# Altium PCB IDC_AIO_ELOAD.PcbDoc
Units mm, origin at the board's own origin, x right, y up, seen from the top; angles counter-clockwise.
Board outline 64 x 88 mm, 2 copper layers (Top Layer, Bottom Layer); 23 components, 104 nets, 290 pads, 198 vias.
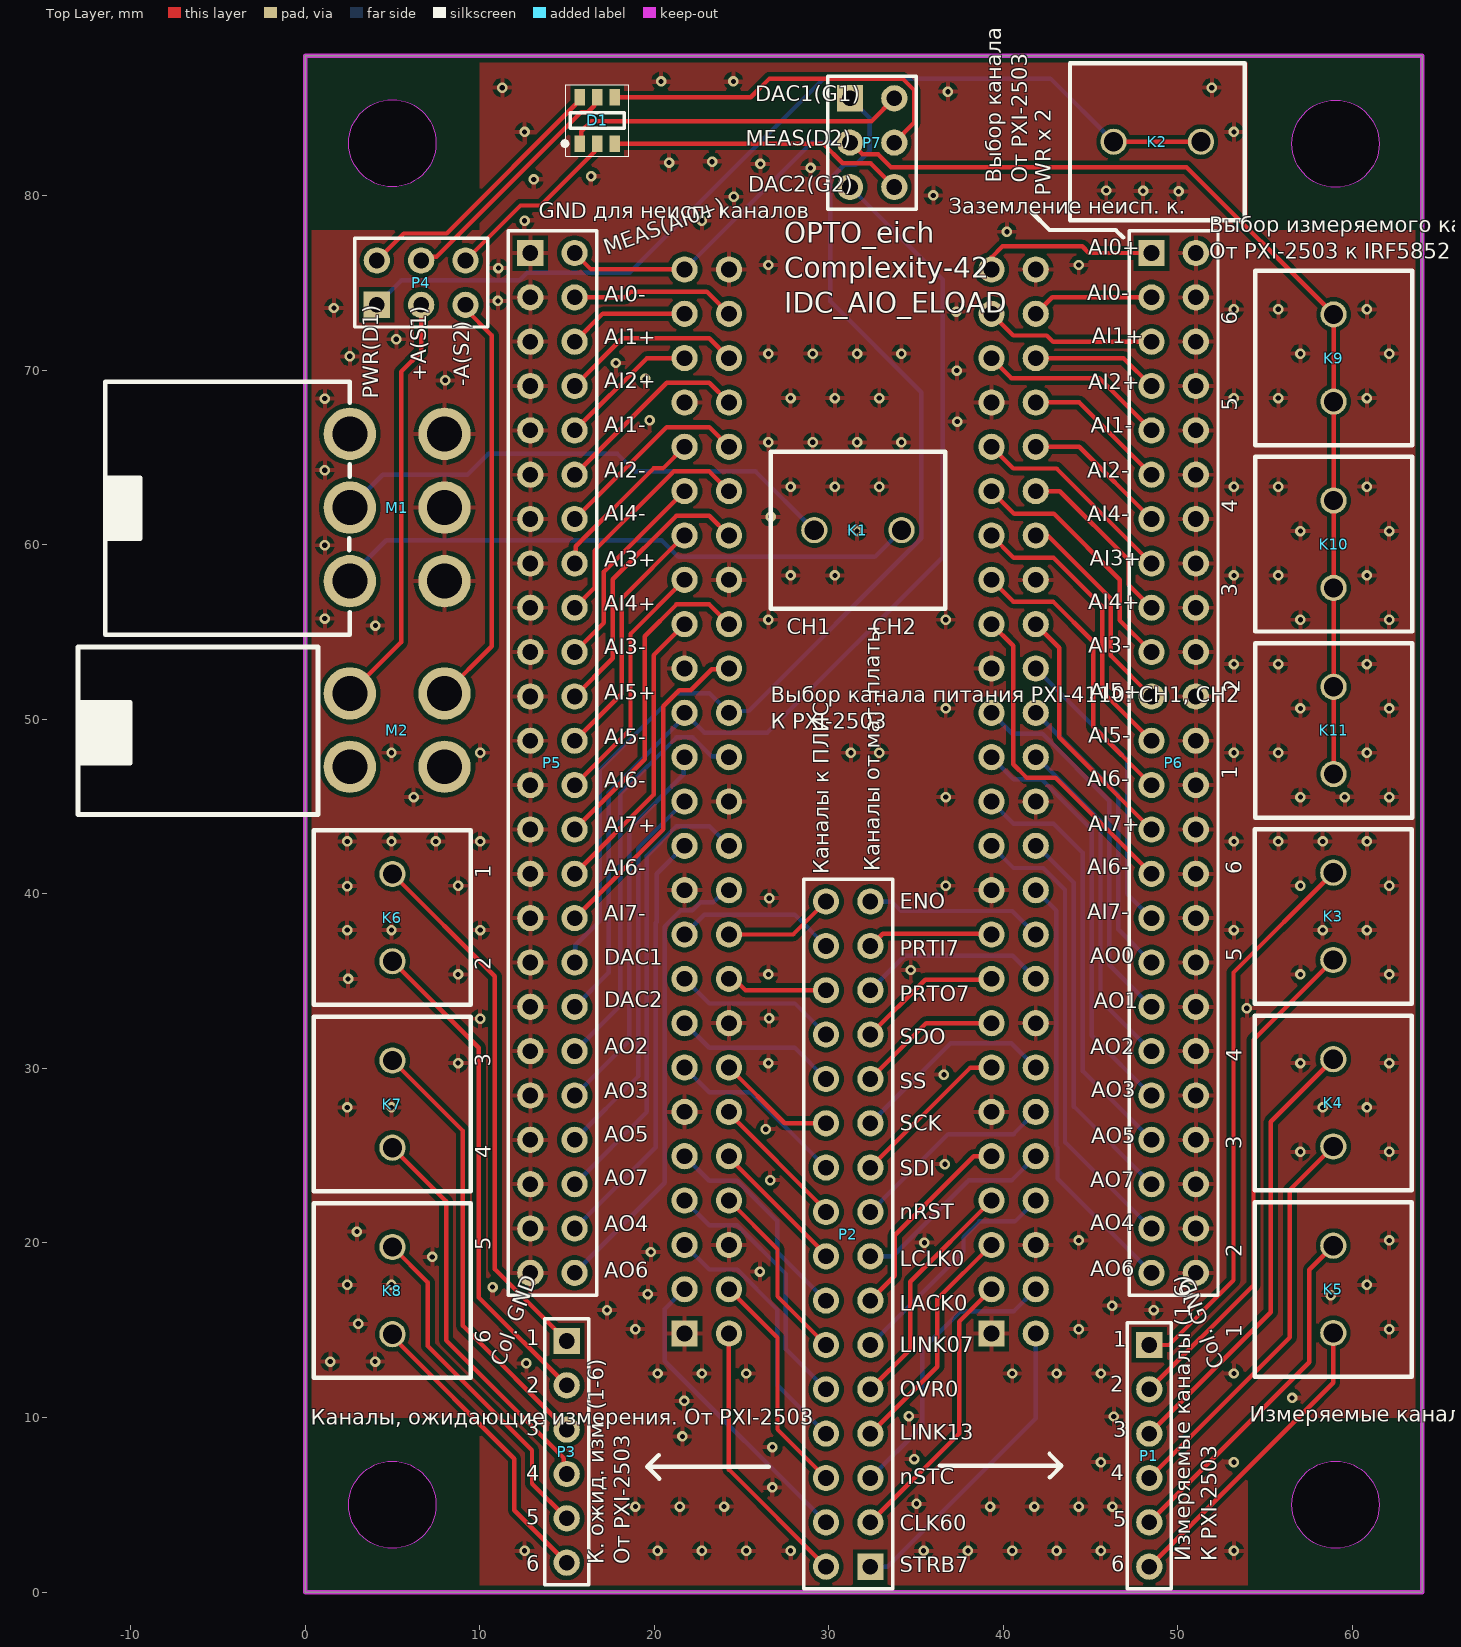
[diagram p0: Top Layer view]
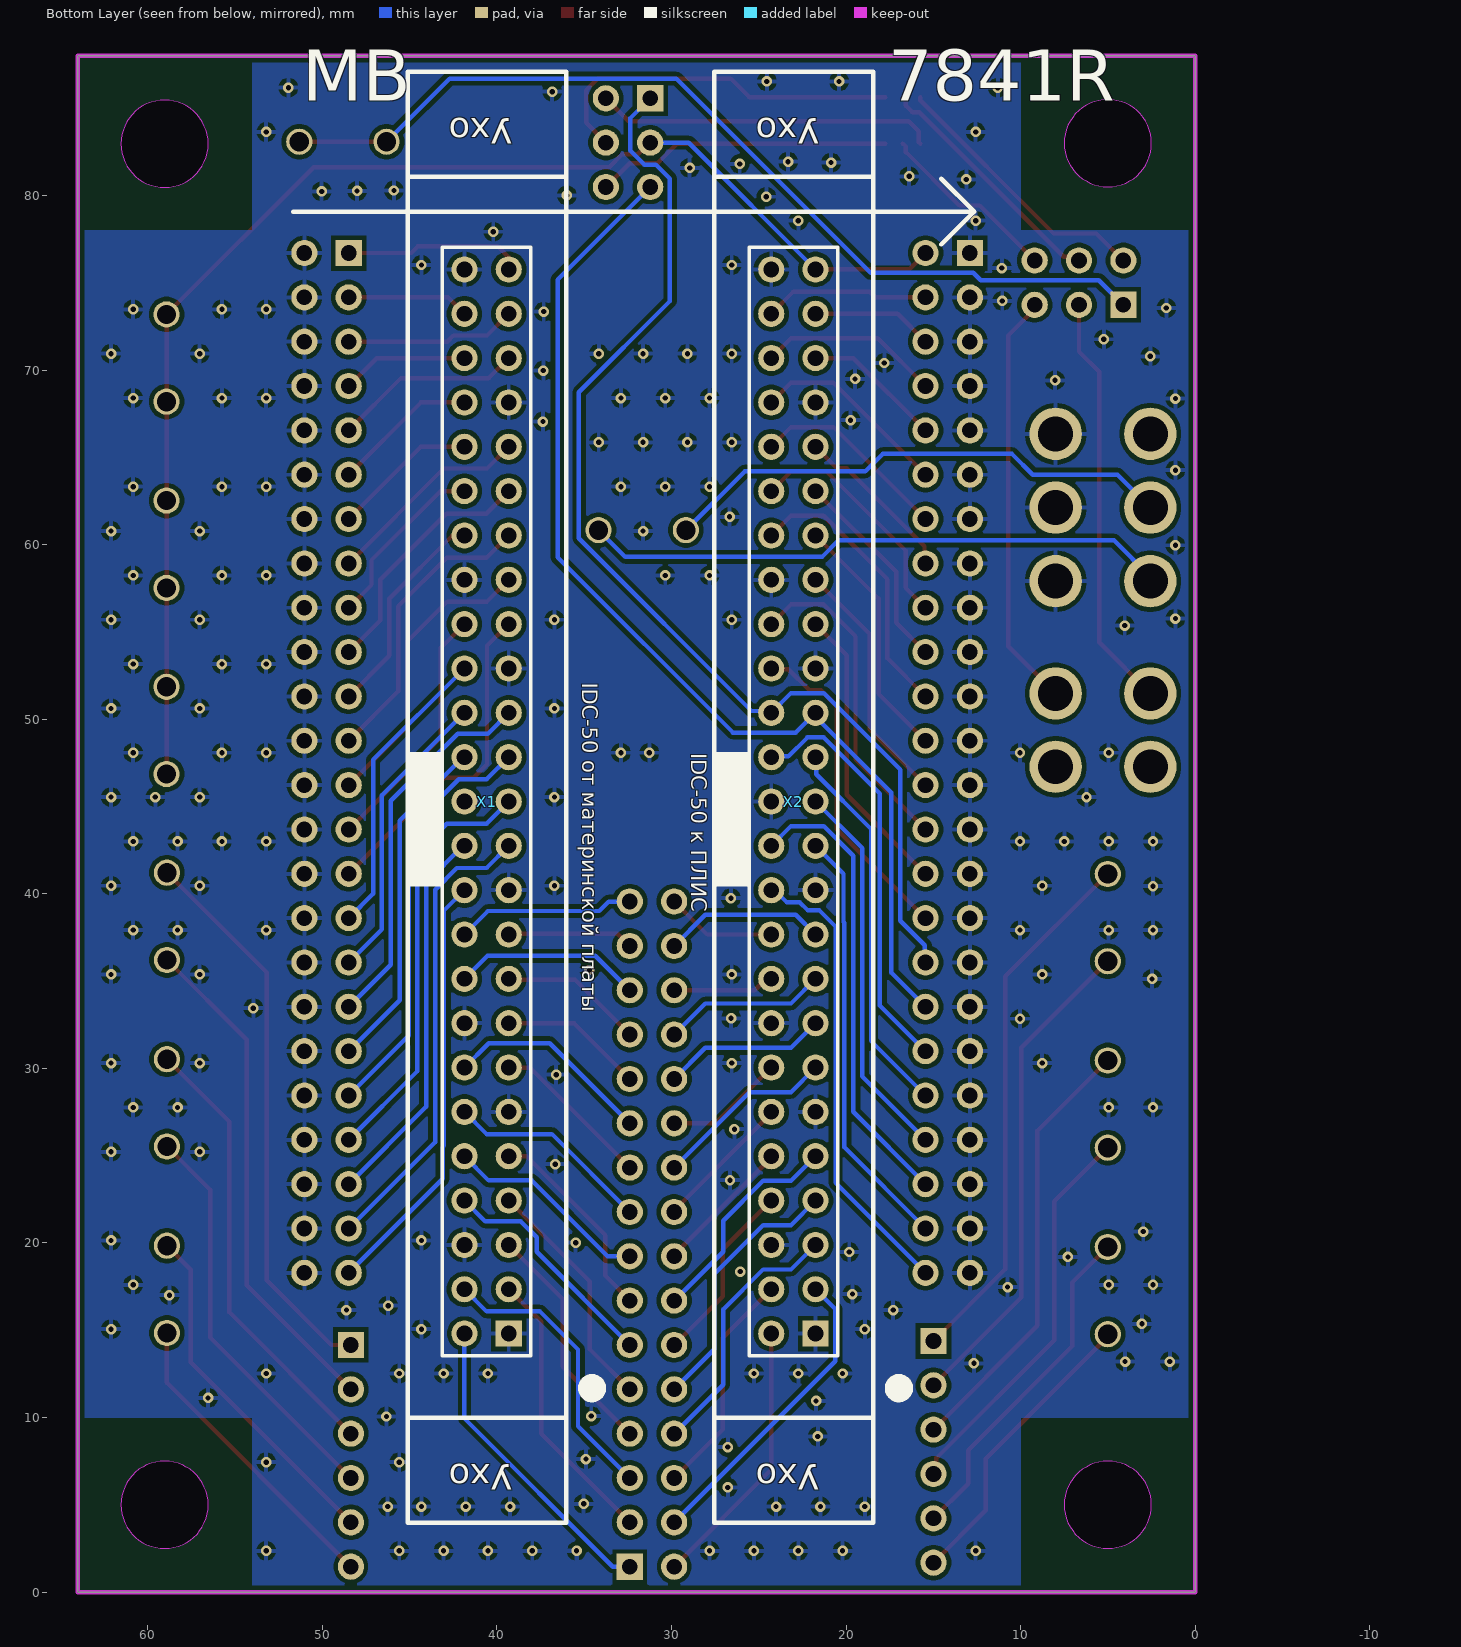
[diagram p1: Bottom Layer view, seen from below]

## Layer stack, top to bottom
Top Solder: solder mask 0.0102, Solder Resist, Dk 3.5
Top Layer: signal copper 0.0356
Dielectric 1: dielectric 0.32, FR-4, Dk 4.8
Bottom Layer: signal copper 0.0356
Bottom Solder: solder mask 0.0102, Solder Resist, Dk 3.5

## Board outline
0,0 0,88 64,88 64,0
cut-out: 59.032,2.5 cw(c59.032,5) 56.532,5 cw(c59.032,5) 59.032,7.5 cw(c59.032,5) 61.532,5 cw(c59.032,5)
cut-out: 59.032,80.468 cw(c59.032,82.968) 56.532,82.968 cw(c59.032,82.968) 59.032,85.468 cw(c59.032,82.968) 61.532,82.968 cw(c59.032,82.968)
cut-out: 5,2.5 cw(c5,5) 2.5,5 cw(c5,5) 5,7.5 cw(c5,5) 7.5,5 cw(c5,5)
cut-out: 5,80.5 cw(c5,83) 2.5,83 cw(c5,83) 5,85.5 cw(c5,83) 7.5,83 cw(c5,83)

## Design rules (kind name [scope] priority, off if disabled: settings)
Clearance [All] p1: gap=0.254 ignorepadtopadclearanceinfootprint=FALSE except(0: Arc-Hole Track-Hole SMDPad-Hole THPad-Hole Via-Hole Fill-Hole Poly-Hole Region-Hole Text-Hole)
MinimumSolderMaskSliver [All] p1: minsoldermaskwidth=0.1
PolygonConnect [All] p1: connectstyle=Relief reliefconductorwidth=0.254 reliefentries=4 polygonreliefangle="90 Angle" airgapwidth=0.254
RoutingVias [All] p1: holewidth=0.711 width=1.27 viastyle="Through Hole" minholewidth=0.711 minwidth=1.27 maxholewidth=0.711 maxwidth=1.27
SilkToSolderMaskClearance [IsPad] p1: minsilkscreentomaskgap=0.1 clearancetoexposedcopper=TRUE
SolderMaskExpansion [All] p1: expansion=0.102 istentingtop=FALSE
UnRoutedNet [All] p1: checkbadconnections=TRUE
Width [All] p1: maxlimit=0.254 minlimit=0.254 preferedwidth=0.254
27 further rules are at their usual default settings.

## Components (designator, comment, footprint, x,y, rotation, side; value= is the part's Value field where it differs from the comment)
D1 "IRF5852PbF" IRF5852PbF 16.739,84.303 r90 top
K1 "KLEMMNIK-2" KLEMMNIK-2 31.674,60.833 r180 top locked
K2 "KLEMMNIK-2" KLEMMNIK-2 48.819,83.083 r0 top locked
K3 "KLEMMNIK-2" KLEMMNIK-2 58.903,38.71 r270 top locked
K4 "KLEMMNIK-2" KLEMMNIK-2 58.903,28.026 r270 top locked
K5 "KLEMMNIK-2" KLEMMNIK-2 58.903,17.343 r270 top locked
K6 "KLEMMNIK-2" KLEMMNIK-2 5.004,38.638 r270 top locked
K7 "KLEMMNIK-2" KLEMMNIK-2 5.004,27.955 r270 top locked
K8 "KLEMMNIK-2" KLEMMNIK-2 5.004,17.272 r270 top locked
K9 "KLEMMNIK-2" KLEMMNIK-2 58.922,70.694 r270 top locked
K10 "KLEMMNIK-2" KLEMMNIK-2 58.922,60.026 r270 top locked
K11 "KLEMMNIK-2" KLEMMNIK-2 58.922,49.358 r270 top locked
M1 "POWER-4110" POWER-4110 -8.359,63.221 r90 top locked
M2 "VOLTMETER-4070" VOLTMETER-4070 -5.387,48.878 r270 top locked
P1 "Header 6" HDR1X6 48.363,14.156 r270 top locked
P2 "Header 16X2A" HDR2X16_CEN 32.385,1.456 r90 top locked
P3 "Header 6" HDR1X6 14.988,14.385 r270 top locked
P4 "Header 3X2A" HDR2X3_CEN 4.112,73.741 r0 top locked
P5 "Header 24X2" HDR2X24 12.903,76.708 r270 top locked
P6 "Header 24X2" HDR2X24 48.489,76.708 r270 top locked
P7 "Header 3X2A" HDR2X3_CEN 31.217,85.573 r270 top locked
X1 "IDC_AIO" IDC_AIO 39.319,14.808 r90 bottom locked
X2 "IDC_AIO" IDC_AIO 21.742,14.808 r90 bottom locked

## Footprints (in the part's own frame and the unit in brackets; to place one, negate y for a bottom-side part, rotate by r counter-clockwise, add the part's x,y. Pads: shape width x height; smd on the part's side, far side on the other; paste and mask are expansions set on the pad)
HDR1X6 [mm] "Connector; Header; 6 Position"
  rect 1.5x1.5 hole 0.9: 1(0,0)
  round 1.5 hole 0.9: 2(2.54,0) 3(5.08,0) 4(7.62,0) 5(10.16,0) 6(12.7,0)
  silkscreen extent -1.27,-1.27 13.97,1.27
HDR2X3_CEN [mm] "Connector; Header; 3x2 Position"
  rect 1.5x1.5 hole 0.9: 1(0,0)
  round 1.5 hole 0.9: 2(2.54,0) 3(5.08,0) 4(0,2.54) 5(2.54,2.54) 6(5.08,2.54)
  silkscreen extent -1.27,-1.27 6.35,3.81
HDR2X16_CEN [mm] "Connector; Header; 16x2 Position"
  rect 1.5x1.5 hole 0.9: 1(0,0)
  round 1.5 hole 0.9: 2(2.54,0) 3(5.08,0) 4(7.62,0) 5(10.16,0) 6(12.7,0) 7(15.24,0) 8(17.78,0) 9(20.32,0) 10(22.86,0) 11(25.4,0) 12(27.94,0) 13(30.48,0) 14(33.02,0) 15(35.56,0) 16(38.1,0) 17(0,2.54) 18(2.54,2.54) 19(5.08,2.54) 20(7.62,2.54) 21(10.16,2.54) 22(12.7,2.54) 23(15.24,2.54) 24(17.78,2.54) 25(20.32,2.54) 26(22.86,2.54) 27(25.4,2.54) 28(27.94,2.54) 29(30.48,2.54) 30(33.02,2.54) 31(35.56,2.54) 32(38.1,2.54)
  silkscreen extent -1.27,-1.27 39.37,3.81
HDR2X24 [mm] "Connector; Header; 24x2 Position"
  rect 1.5x1.5 hole 0.9: 1(0,0)
  round 1.5 hole 0.9: 2(0,2.54) 3(2.54,0) 4(2.54,2.54) 5(5.08,0) 6(5.08,2.54) 7(7.62,0) 8(7.62,2.54) 9(10.16,0) 10(10.16,2.54) 11(12.7,0) 12(12.7,2.54) 13(15.24,0) 14(15.24,2.54) 15(17.78,0) 16(17.78,2.54) 17(20.32,0) 18(20.32,2.54) 19(22.86,0) 20(22.86,2.54) 21(25.4,0) 22(25.4,2.54) 23(27.94,0) 24(27.94,2.54) 25(30.48,0) 26(30.48,2.54) 27(33.02,0) 28(33.02,2.54) 29(35.56,0) 30(35.56,2.54) 31(38.1,0) 32(38.1,2.54) 33(40.64,0) 34(40.64,2.54) 35(43.18,0) 36(43.18,2.54) 37(45.72,0) 38(45.72,2.54) 39(48.26,0) 40(48.26,2.54) 41(50.8,0) 42(50.8,2.54) 43(53.34,0) 44(53.34,2.54) 45(55.88,0) 46(55.88,2.54) 47(58.42,0) 48(58.42,2.54)
  silkscreen extent -1.27,-1.27 59.69,3.81
IDC_AIO [mm]
  rect 1.5x1.5 hole 0.9: 1(0,0)
  round 1.5 hole 0.9: 2(0,2.54) 3(2.54,0) 4(2.54,2.54) 5(5.08,0) 6(5.08,2.54) 7(7.62,0) 8(7.62,2.54) 9(10.16,0) 10(10.16,2.54) 11(12.7,0) 12(12.7,2.54) 13(15.24,0) 14(15.24,2.54) 15(17.78,0) 16(17.78,2.54) 17(20.32,0) 18(20.32,2.54) 19(22.86,0) 20(22.86,2.54) 21(25.4,0) 22(25.4,2.54) 23(27.94,0) 24(27.94,2.54) 25(30.48,0) 26(30.48,2.54) 27(33.02,0) 28(33.02,2.54) 29(35.56,0) 30(35.56,2.54) 31(38.1,0) 32(38.1,2.54) 33(40.64,0) 34(40.64,2.54) 35(43.18,0) 36(43.18,2.54) 37(45.72,0) 38(45.72,2.54) 39(48.26,0) 40(48.26,2.54) 41(50.8,0) 42(50.8,2.54) 43(53.34,0) 44(53.34,2.54) 45(55.88,0) 46(55.88,2.54) 47(58.42,0) 48(58.42,2.54) 49(60.96,0) 50(60.96,2.54)
  silkscreen extent -10.83,-5.16 72.27,5.85
IRF5852PbF [mm] "TSOP, 6-Leads, Body 3,00x1,50mm, Pitch 1,00mm, IPC Medium Density"
  rect 0.95x0.6 smd: 1(-1.325,1) 2(-1.325,0) 3(-1.325,-1) 4(1.325,-1) 5(1.325,0) 6(1.325,1)
  silkscreen extent -2.05,-1.8 2.05,1.97, body extent -0.85,-1.55 0.85,1.55, height 1.1
KLEMMNIK-2 [mm]
  round 1.5 hole 1.1: 1(-2.5,0) 2(2.5,0)
  silkscreen extent -5,-4.5 5,4.5
POWER-4110 [mm]
  round 3 hole 2: 1(3.125,-10.925) 2(-1.092,-10.925) 3(-5.31,-10.925) 4(-5.31,-16.347) 5(-1.092,-16.347) 6(3.125,-16.347)
  silkscreen extent -8.37,-10.92 6.12,3.08
VOLTMETER-4070 [mm]
  round 3 hole 2: 1(-2.6,13.375) 2(-2.6,7.952) 3(1.6,7.952) 4(1.6,13.375)
  silkscreen extent -5.26,-7.62 4.34,6.13

## Part data
P1 P3: "Header, 6-Pin", LatestRevisionDate=17-Jul-2002, LatestRevisionNote="Re-released for DXP Platform.", Publisher="Altium Limited"
P2: "Header, 16-Pin, Dual row", LatestRevisionDate=17-Jul-2002, LatestRevisionNote="Re-released for DXP Platform.", Publisher="Altium Limited"
P4 P7: "Header, 3-Pin, Dual row", LatestRevisionDate=17-Jul-2002, LatestRevisionNote="Re-released for DXP Platform.", Publisher="Altium Limited"
P5 P6: "Header, 24-Pin, Dual row", LatestRevisionDate=17-Jul-2002, LatestRevisionNote="Re-released for DXP Platform.", Publisher="Altium Limited"

## Via types
v1: diameter 0.6/0.6 (per signal layer), hole 0.3, Top Layer to Bottom Layer, 198 vias

## Nets (pads, with @x,y where several pads share a name; then routed paths per layer and width w, separated by ;. In a path a pad name is that pad's centre, name@x,y a point inside that pad or via, vN(x,y) a via of type N, cw(c..) or ccw(c..) an arc to the next point about the centre after c; other vN are vias at no path point)
+A: M2.2 P4.2 | length 24
  Top Layer w0.254: M2.2 5.5,54.413 5.5,69.9 6.652,71.052 P4.2
+A_safe: D1.5 P4.5 | length 14.1
  Top Layer w0.254: P4.5 6.864,76.493 7.532,76.493 15.811,84.772 16.196,84.772 16.566,85.141 16.566,85.455 D1.5
-A: M2.1 P4.3 | length 24
  Top Layer w0.254: M2.1 10.7,54.19 10.7,71.988 9.192,73.496 P4.3
-A_safe: D1.2 P4.6 | length 10.5
  Top Layer w0.254: P4.6 12.343,79.432 13.507,79.432 16.566,82.491 16.566,82.805 D1.2
AI0+: P6.1 X1.49 | length 9.6
  Top Layer w0.254: X1.49@39.319,76.454 39.954,77.089 44.521,77.089 44.902,76.708 P6.1
AI0-: P6.3 X1.48 | length 7
  Top Layer w0.254: X1.48 42.799,74.168 P6.3
AI0-_OUT: P5.4 X2.48 | length 9.5
  Top Layer w0.254: P5.4 18.347,74.168 18.677,74.498 23.012,74.498 X2.48
AI1+: P6.5 X1.47 | length 9.8
  Top Layer w0.254: X1.47 40.564,71.984 42.494,71.984 42.85,71.628 P6.5
AI1+_OUT: P5.6 X2.47 | length 7
  Top Layer w0.254: P5.6 17.043,73.228 X2.47
AI1-: P6.9 X1.45 | length 10.9
  Top Layer w0.254: X1.45 40.462,69.545 45.491,69.545 P6.9
AI1-_OUT: P5.10 X2.45 | length 8
  Top Layer w0.254: P5.10 19.583,70.688 X2.45
AI2+: P6.7 X1.46 | length 7.3
  Top Layer w0.254: X1.46 46.888,70.688 P6.7
AI2+_OUT: P5.8 X2.46 | length 10.4
  Top Layer w0.254: P5.8 18.174,71.819 23.151,71.819 X2.46
AI2-: P6.11 X1.44 | length 8.3
  Top Layer w0.254: X1.44 44.348,68.148 P6.11
AI2-_OUT: P5.12 X2.44 | length 11.5
  Top Layer w0.254: P5.12 20.714,69.279 23.151,69.279 X2.44
AI3+: P6.15 X1.41 | length 11.9
  Top Layer w0.254: X1.41 40.564,64.364 43.053,64.364 P6.15
AI3+_OUT: P5.16 X2.41 | length 9.5
  Top Layer w0.254: P5.16@15.502,58.987 15.502,59.91 19.959,64.367 20.501,64.367 X2.41
AI3-: P6.19 X1.39 | length 14.4
  Top Layer w0.254: X1.39 40.615,61.773 42.9,61.773 46.674,57.999 46.674,55.663 P6.19
AI3-_OUT: P5.20 X2.39 | length 11.8
  Top Layer w0.254: P5.20 17.12,55.524 17.12,58.445 X2.39
AI4+: P6.17 X1.40 | length 10.2
  Top Layer w0.254: X1.40 43.231,63.068 47.182,59.117 47.182,57.695 P6.17
AI4+_OUT: P5.18 X2.40 | length 13.8
  Top Layer w0.254: P5.18 16.586,57.531 16.586,59.665 21.121,64.199 23.151,64.199 X2.40
AI4-: P6.13 X1.42 | length 8.3
  Top Layer w0.254: X1.42 44.348,65.608 P6.13
AI4-_OUT: P5.14 X2.42 | length 11.5
  Top Layer w0.254: P5.14 20.714,66.739 23.151,66.739 X2.42
AI5+: P6.21 X1.38 | length 12.4
  Top Layer w0.254: X1.38 42.545,60.528 46.166,56.907 46.166,53.631 P6.21
AI5+_OUT: P5.22 X2.38 | length 16.2
  Top Layer w0.254: P5.22 17.628,53.492 17.628,58.013 21.274,61.659 23.151,61.659 X2.38
AI5-: P6.23 X1.37 | length 16.9
  Top Layer w0.254: X1.37 40.589,59.258 42.874,59.258 45.658,56.475 45.658,51.599 P6.23
AI5-_OUT: P5.24 X2.37 | length 14.4
  Top Layer w0.254: P5.24 18.136,51.46 18.136,56.921 X2.37
AI6+: P6.25 X1.35 | length 16.9
  Top Layer w0.254: X1.35 40.564,56.744 42.849,56.744 45.15,54.443 45.15,49.567 P6.25
AI6+_OUT: P5.26 X2.35 | length 14.4
  Top Layer w0.254: P5.26 18.644,49.428 18.644,54.889 X2.35
AI6-: P6.29 X1.33 | length 19.1
  Top Layer w0.254: X1.33 40.564,54.204 40.564,47.422 41.326,46.66 42.977,46.66 P6.29
AI6-_OUT: P5.30 X2.33 | length 16.9
  Top Layer w0.254: P5.30 19.964,45.669 19.964,53.67 X2.33
AI7+: P6.27 X1.34 | length 14.5
  Top Layer w0.254: X1.34 43.205,54.102 43.205,48.971 P6.27
AI7+_OUT: P5.28 X2.34 | length 18.7
  Top Layer w0.254: P5.28@15.509,43.754 19.456,47.701 19.456,54.762 21.274,56.579 23.151,56.579 X2.34
AI7-: P6.31 X1.32 | length 17
  Bottom Layer w0.254: X1.32 47.092,47.676 47.092,40.005 P6.31
AI7-_OUT: P5.32 X2.32 | length 18.9
  Top Layer w0.254: P5.32 20.523,43.688 20.523,50.748 21.433,51.658 22.092,51.658 23.3,52.867 24.241,52.867 X2.32
AO0: P6.33 X1.30 | length 17
  Bottom Layer w0.254: X1.30 46.584,45.644 46.584,37.973 P6.33
AO1: P6.35 X1.29 | length 21.7
  Bottom Layer w0.254: X1.29 40.513,49.174 42.24,49.174 46.076,45.339 46.076,35.941 P6.35
AO2: P6.37 X1.28 | length 19.6
  Bottom Layer w0.254: X1.28 41.935,47.828 45.568,44.195 45.568,33.909 P6.37
AO2_OUT: P5.38 X2.28 | length 23.8
  Bottom Layer w0.254: P5.38 18.059,33.604 18.059,45.745 21.274,48.959 22.211,48.959 23.3,47.87 X2.28@24.282,47.87
AO3: P6.39 X1.27 | length 24.1
  Bottom Layer w0.254: X1.27 40.589,46.558 42.189,46.558 45.06,43.688 45.06,31.877 P6.39
AO3_OUT: P5.40 X2.27 | length 22
  Bottom Layer w0.254: P5.40 18.567,31.572 18.567,43.713 21.701,46.846 21.701,47.787 X2.27
AO4: P6.45 X1.23 | length 26.7
  Bottom Layer w0.254: X1.23 40.589,41.478 42.291,41.478 43.536,40.234 43.536,25.781 P6.45
AO4_OUT: P5.46 X2.23 | length 24.5
  Bottom Layer w0.254: P5.46 20.091,25.476 20.091,38.335 20.142,38.386 20.142,41.148 X2.23
AO5: P6.41 X1.25 | length 24.5
  Bottom Layer w0.254: X1.25 40.589,44.018 42.874,44.018 44.552,42.341 44.552,29.845 P6.41
AO5_OUT: P5.42 X2.25 | length 22
  Bottom Layer w0.254: P5.42 19.075,29.54 19.075,42.621 X2.25
AO6: P6.47 X1.22 | length 24.7
  Bottom Layer w0.254: X1.22 43.028,39.04 43.028,25.571 43.104,25.494 43.104,23.673 P6.47
AO6_OUT: P5.48 X2.22 | length 26.8
  Bottom Layer w0.254: P5.48 20.599,23.444 20.599,38.125 21.522,39.047 22.181,39.047 22.642,39.509 23.383,39.509 24.082,40.208 X2.22 X2.22@24.092,40.018
AO7: P6.43 X1.24 | length 22.2
  Bottom Layer w0.254: X1.24 41.935,42.748 44.044,40.639 44.044,27.813 P6.43
AO7_OUT: P5.44 X2.24 | length 26.4
  Bottom Layer w0.254: P5.44 19.583,27.508 19.583,42.189 21.274,43.879 23.151,43.879 X2.24
CH1: K1.2 M1.2 | length 29.7
  Bottom Layer w0.254: M1.2 4.447,64.009 9.3,64.009 10.491,65.2 17.9,65.2 18.901,64.199 25.808,64.199 K1.2
CH2: K1.1 M1.3 | length 33.8
  Bottom Layer w0.254: M1.3 2.566,58.166 4.647,60.247 20.424,60.247 21.371,59.3 32.641,59.3 K1.1
CLK_60: P2.2 X1.3 | length 16.2
  Top Layer w0.254: P2.2 37.465,9.076 37.465,15.494 X1.3
CLK_60_DIG: P2.18 X2.3 | length 17.6
  Bottom Layer w0.254: X2.3 20.611,16.217 20.611,13.23 P2.18
DAC1: P5.34 P7.1 X2.30 | length 65.6
  Bottom Layer w0.254: P5.34 15.485,36.11 15.485,37.05 16.894,38.46 16.894,47.12 21.274,51.499 23.151,51.499 X2.30 24.387,50.473 25.413,50.473 35.305,60.365 35.305,68.735 30.086,73.954 30.086,80.961 30.887,81.763 31.546,81.763 32.348,82.564 32.348,84.442 P7.1
DAC1_safe: D1.1 P7.4 | length 19.5
  Top Layer w0.254: D1.1 15.827,83.066 15.827,83.685 16.406,84.264 32.448,84.264 P7.4
DAC2: P5.36 P7.3 X2.29 | length 62.3
  Bottom Layer w0.254: P5.36 17.402,35.487 17.402,45.806 21.742,50.146 X2.29 22.873,49.237 26.478,49.237 36.524,59.283 36.524,75.185 P7.3
DAC2_safe: D1.3 P7.6 | length 17
  Top Layer w0.254: D1.3 29.672,82.978 30.795,81.854 32.395,81.854 P7.6
ENO: P2.16 X1.20 | length 10.3
  Bottom Layer w0.254: P2.16 33.598,39.556 34.14,39.014 40.513,39.014 X1.20
ENO_DIG: P2.32 X2.20 | length 6.3
  Top Layer w0.254: X2.20 27.957,37.668 P2.32
GND: M1.4 M1.5 M1.6 P5.1 P5.3 P5.5 P5.7 P5.9 P5.11 P5.13 P5.15 P5.17 P5.19 P5.21 P5.23 P5.25 P5.27 P5.29 P5.31 P5.33 P5.35 P5.37 P5.39 P5.41 P5.43 P5.45 P5.47 P6.2 P6.4 P6.6 P6.8 P6.10 P6.12 P6.14 P6.16 P6.18 P6.20 P6.22 P6.24 P6.26 P6.28 P6.30 P6.32 P6.34 P6.36 P6.38 P6.40 P6.42 P6.44 P6.46 P6.48 X1.1 X1.6 X1.11 X1.16 X1.21 X1.26 X1.31 X1.36 X1.43 X1.50 X2.1 X2.6 X2.11 X2.16 X2.21 X2.26 X2.31 X2.36 X2.43 X2.50
  other v1: 12.573,2.362 20.193,2.362 22.733,2.362 25.273,2.362 27.813,2.362 35.433,2.362 37.973,2.362 40.513,2.362 43.053,2.362 45.593,2.362 53.213,2.362 18.923,4.902 21.463,4.902 24.003,4.902 39.243,4.902 41.783,4.902 44.323,4.902 46.253,4.902 35.027,5.055 26.772,5.994 45.593,7.442 53.213,7.442 34.9,7.62 26.772,8.306 21.615,8.915 46.33,10.058 34.595,10.084 21.717,10.947 56.54,11.125 20.193,12.522 22.733,12.522 25.273,12.522 40.513,12.522 43.053,12.522 45.593,12.522 53.213,12.522 12.675,13.106 1.448,13.208 4.013,13.208 18.923,15.062 44.323,15.062 62.103,15.062 3.048,15.367 17.297,16.154 48.616,16.154 46.228,16.408 58.754,17.011 19.634,17.069 10.744,17.475 2.413,17.602 4.953,17.602 60.833,17.602 26.06,18.364 7.29,19.202 19.812,19.482 35.484,20.015 44.323,20.142 62.103,20.142 2.972,20.65 26.645,23.597 36.652,24.511 57.023,25.222 62.103,25.222 26.391,26.518 2.413,27.762 4.953,27.762 58.293,27.762 60.833,27.762 36.601,29.642 8.763,30.302 26.543,30.302 57.023,30.302 62.103,30.302 10.033,32.842 26.582,32.868 53.95,33.452 2.464,35.128 8.763,35.382 26.543,35.382 57.023,35.382 62.103,35.382 34.696,35.636 2.413,37.922 4.953,37.922 10.033,37.922 53.213,37.922 58.293,37.922 60.833,37.922 26.594,39.751 2.413,40.437 8.763,40.462 36.703,40.462 57.023,40.462 62.103,40.462 2.413,43.002 4.953,43.002 7.493,43.002 10.033,43.002 53.213,43.002 55.753,43.002 58.293,43.002 60.833,43.002 6.223,45.542 36.703,45.542 57.023,45.542 59.563,45.542 62.103,45.542 4.953,48.082 10.033,48.082 31.267,48.082 32.893,48.082 53.213,48.082 55.753,48.082 60.833,48.082 36.703,50.622 57.023,50.622 62.103,50.622 53.213,53.162 55.753,53.162 60.833,53.162 4.031,55.369 26.543,55.702 36.703,55.702 57.023,55.702 62.103,55.702 1.131,55.769 27.813,58.242 30.353,58.242 53.213,58.242 55.753,58.242 60.833,58.242 1.131,59.969 31.623,60.782 57.023,60.782 62.103,60.782 26.67,61.595 27.813,63.322 30.353,63.322 32.893,63.322 53.213,63.322 55.753,63.322 60.833,63.322 1.131,64.269 26.543,65.862 29.083,65.862 31.623,65.862 34.163,65.862 37.363,67.056 19.736,67.132 1.131,68.369 27.813,68.402 30.353,68.402 32.893,68.402 53.213,68.402 55.753,68.402 60.833,68.402 8.026,69.418 19.482,69.494 37.338,69.977 17.805,70.409 2.565,70.79 26.543,70.942 29.083,70.942 31.623,70.942 34.163,70.942 57.023,70.942 62.103,70.942 5.231,71.769 37.313,73.355 53.213,73.482 55.753,73.482 60.833,73.482 1.651,73.558 11.049,73.965 11.074,75.844 26.543,76.022 44.323,76.022 40.208,77.927 12.573,78.562 22.733,78.562 24.562,79.934 35.992,80.01 50.038,80.239 48.006,80.264 45.898,80.289 13.106,80.924 16.383,81.102 28.956,81.585 26.086,81.813 20.853,81.89 23.317,81.94 12.573,83.642 53.213,83.642 36.83,85.954 11.303,86.182 51.943,86.182 20.396,86.538 24.536,86.538
LACK_0: P2.7 X1.9 | length 11.7
  Top Layer w0.254: P2.7 32.385,16.72 33.782,18.117 33.782,20.447 38.303,24.968 X1.9
LACK_0_DIG: P2.23 X2.9 | length 12.6
  Bottom Layer w0.254: X2.9 23.151,23.559 24.751,23.559 27.04,21.27 27.04,19.502 P2.23
LCLK_0: P2.8 X1.10 | length 11.8
  Bottom Layer w0.254: P2.8 33.661,19.236 37.932,23.508 38.007,23.582 40.473,23.582 X1.10
LCLK_0_DIG: P2.24 X2.10 | length 8
  Top Layer w0.254: X2.10 24.282,24.884 29.845,19.321 P2.24
LINK_0_7: P2.6 X1.8 | length 13.4
  Bottom Layer w0.254: P2.6 37.719,19.49 37.719,20.32 38.633,21.234 40.665,21.234 X1.8
LINK_0_7_DIG: P2.22 X2.8 | length 10.6
  Top Layer w0.254: X2.8 27.064,19.647 27.064,16.938 P2.22
LINK_1_3: P2.4 X1.5 | length 13.7
  Top Layer w0.254: P2.4 36.22,12.912 36.22,16.789 X1.5
LINK_1_3_DIG: P2.20 X2.5 | length 15.1
  Bottom Layer w0.254: X2.5 23.151,18.479 24.751,18.479 27.04,16.19 27.04,11.882 P2.20
MEAS_1: K3.1 P1.1 | length 32.1
  Top Layer w0.254: P1.1 49.488,14.156 53.188,17.856 53.188,35.495 K3.1
MEAS_2: K3.2 P1.2 | length 29
  Top Layer w0.254: P1.2 54.331,17.584 54.331,31.638 K3.2
MEAS_3: K4.1 P1.3 | length 25.8
  Top Layer w0.254: P1.3 55.321,16.035 55.321,26.945 K4.1
MEAS_4: K4.2 P1.4 | length 23.4
  Top Layer w0.254: P1.4 56.413,14.587 56.413,23.037 K4.2
MEAS_5: K5.1 P1.5 | length 20.2
  Top Layer w0.254: P1.5 57.531,13.165 57.531,18.472 K5.1
MEAS_6: K5.2 P1.6 | length 17.8
  Top Layer w0.254: P1.6 58.903,11.996 K5.2
MEAS_ADC: K9.1 K9.2 K10.1 K10.2 K11.1 K11.2 P5.2 P7.2 X2.49 | length 77.3
  Top Layer w0.254: P5.2 16.383,75.768 X2.49 ; P7.2 31.265,83.033 31.935,82.362 32.827,82.362 33.566,81.624 50.492,81.624 K9.1 K9.2 K10.1 K10.2 K11.1 K11.2
  Bottom Layer w0.254: X2.49 29.007,83.033 P7.2
MEAS_ADC_safe: D1.4 P7.5 | length 21.3
  Top Layer w0.254: D1.4 25.53,85.628 26.606,86.704 34.225,86.704 34.888,86.041 34.888,84.164 P7.5
MEAS_EXTRA_1: K6.1 P3.1 | length 30.9
  Top Layer w0.254: K6.1 10.871,35.271 10.871,18.502 P3.1
MEAS_EXTRA_2: K6.2 P3.2 | length 28.4
  Top Layer w0.254: K6.2 9.957,31.185 9.957,16.876 P3.2
MEAS_EXTRA_3: K7.1 P3.3 | length 25.3
  Top Layer w0.254: K7.1 9.042,26.417 9.042,15.251 P3.3
MEAS_EXTRA_4: K7.2 P3.4 | length 22.8
  Top Layer w0.254: K7.2 8.077,22.382 8.077,14.427 14.818,7.686 14.818,6.935 P3.4
MEAS_EXTRA_5: K8.1 P3.5 | length 19.7
  Top Layer w0.254: K8.1 7.036,17.74 7.036,14.097 13,8.133 13,6.213 P3.5
MEAS_EXTRA_6: K8.2 P3.6 | length 17.2
  Top Layer w0.254: K8.2 5.004,14.629 11.989,7.644 11.989,4.684 P3.6
nRST: P2.9 X1.12 | length 11.8
  Bottom Layer w0.254: P2.9 36.847,26.238 40.589,26.238 X1.12
nRST_DIG: P2.25 X2.12 | length 8
  Top Layer w0.254: X2.12 24.282,27.424 29.845,21.861 P2.25
nSTC: P2.3 X1.4 | length 16.5
  Bottom Layer w0.254: P2.3 35.352,9.504 35.352,13.896 37.534,16.078 40.589,16.078 X1.4
nSTC_DIG: P2.19 X2.4 | length 13.1
  Top Layer w0.254: X2.4 27.064,14.567 27.064,9.318 P2.19
OVR_0: P2.5 X1.7 | length 13.7
  Top Layer w0.254: P2.5 34.671,13.902 34.671,17.78 X1.7
OVR_0_DIG: P2.21 X2.7 | length 15.1
  Bottom Layer w0.254: X2.7 23.151,21.019 24.751,21.019 27.548,18.222 27.548,13.914 P2.21
PRTI_7: P2.15 X1.19 | length 7.2
  Top Layer w0.254: P2.15 33.088,37.719 39.268,37.719 X1.19
PRTI_7_DIG: P2.31 X2.19 | length 9.3
  Bottom Layer w0.254: X2.19 22.873,38.799 28.062,38.799 P2.31
PRTO_7: P2.14 X1.18 | length 10.8
  Bottom Layer w0.254: P2.14 34.358,36.449 40.538,36.449 X1.18
PRTO_7_DIG: P2.30 X2.18 | length 5.8
  Top Layer w0.254: X2.18 24.578,35.128 25.23,34.476 P2.30
PWR: K2.1 K2.2 P4.1 | length 54.1
  Top Layer w0.254: K2.1 K2.2
  Bottom Layer w0.254: P4.1 5.521,75.15 12.285,75.15 12.713,75.577 18.592,75.577 29.718,86.704 42.699,86.704 K2.1
PWR_safe: D1.6 P4.4 | length 15.6
  Top Layer w0.254: P4.4 5.657,77.826 8.112,77.826 15.739,85.453 D1.6
SCK: P2.11 X1.14 | length 12
  Bottom Layer w0.254: P2.11 36.974,31.445 40.462,31.445 X1.14
SCK_DIG: P2.27 X2.14 | length 6.9
  Top Layer w0.254: X2.14 27.474,26.856 P2.27
SDI: P2.10 X1.13 | length 9.6
  Top Layer w0.254: P2.10 38.117,30.048 X1.13 X1.13@39.099,30.268
SDI_DIG: P2.26 X2.13 | length 10.5
  Bottom Layer w0.254: X2.13 23.151,28.639 25.522,28.639 P2.26
SDO: P2.13 X1.17 | length 8.3
  Top Layer w0.254: P2.13 35.526,35.077 39.268,35.077 X1.17
SDO_DIG: P2.29 X2.17 | length 9.4
  Bottom Layer w0.254: X2.17 23.151,33.719 28.062,33.719 P2.29
SS: P2.12 X1.15 | length 8.3
  Top Layer w0.254: P2.12 35.577,32.588 X1.15
SS_DIG: P2.28 X2.15 | length 9.4
  Bottom Layer w0.254: X2.15 23.151,31.179 28.062,31.179 P2.28
STROB_7: P2.1 X1.2 | length 17.9
  Bottom Layer w0.254: P2.1 33.367,1.456 41.859,9.948 X1.2
STROB_7_DIG: P2.17 X2.2 | length 15.7
  Top Layer w0.254: X2.2 24.282,7.019 P2.17
pads on no net: M1.1 M2.3 M2.4

## Polygon pours and split planes (outlines as drawn)
GND on Top Layer "GND_L01_P000" (solid, remove dead copper, pour order 0): 0,88 64,88 64,0 0,0
GND on Bottom Layer "NONET_L-01_P-001" (solid, remove dead copper, pour order 1): 0,0 0,88 64,88 64,0

## Keep-outs
Keep-Out Layer:
  the board outline again, w0.254

## Other copper
Multi-Layer:
  pour cut-out: 54,0 64,0 64,10 54,10
  pour cut-out: 54,78 64,78 64,88 54,88
  pour cut-out: 0,0 10,0 10,10 0,10
  pour cut-out: 0,78 10,78 10,88 0,88

## Silkscreen, mask and mechanical layers (free items; w line width, h text height)
Top Overlay:
  lines w0.254: 19.628,7.163 20.288,6.502 ; 20.263,7.849 19.602,7.188 26.562,7.188 ; 36.371,7.23 43.33,7.23 42.67,6.57 ; 41.631,79.045 42.647,78.029 46.431,78.029 46.863,77.597 ; 42.644,7.916 43.305,7.256
  text "DAC1(G1)" at 25.791,85.106 h1.5
  text "MEAS(D2)" at 25.235,82.566 h1.5
  text "Выбор канала питания / От PXI-2503" at 41.656,80.743 h1.5 r90
  text "PWR x 2" at 43.002,79.986 h1.5 r90
  text "DAC2(G2)" at 25.375,79.924 h1.5
  text "Заземление неисп. к." at 36.881,78.664 h1.5
  text "GND для неисп. каналов" at 13.4,78.4 h1.5
  text "AI0+" at 44.87,76.327 h1.5
  text "MEAS(AI0+)" at 17.402,76.313 h1.5 r20
  text "Выбор измеряемого канала / От PXI-2503 к IRF5852" at 51.8,76.098 h1.5
  text "AI0-" at 44.806,73.711 h1.5
  text "AI0-" at 17.145,73.635 h1.5
  text "OPTO_eich / Complexity-42 / IDC_AIO_ELOAD" at 27.447,72.9 h2
  text "6" at 53.702,72.613 h1.5 r90
  text "AI1+" at 45.078,71.247 h1.5
  text "AI1+" at 17.145,71.196 h1.5
  text "+A(S1)" at 7.223,69.369 h1.5 r90
  text "-A(S2)" at 9.687,69.089 h1.5 r90
  text "AI2+" at 17.145,68.682 h1.5
  text "AI2+" at 44.87,68.605 h1.5
  text "PWR(D1)" at 4.48,68.356 h1.5 r90
  text "5" at 53.702,67.66 h1.5 r90
  text "AI1-" at 17.145,66.167 h1.5
  text "AI1-" at 45.014,66.116 h1.5
  text "AI2-" at 17.145,63.551 h1.5
  text "AI2-" at 44.806,63.551 h1.5
  text "4" at 53.702,61.834 h1.5 r90
  text "AI4-" at 17.145,61.087 h1.5
  text "AI4-" at 44.806,61.062 h1.5
  text "AI3+" at 44.938,58.522 h1.5
  text "AI3+" at 17.145,58.445 h1.5
  text "3" at 53.702,57.008 h1.5 r90
  text "AI4+" at 44.87,56.007 h1.5
  text "AI4+" at 17.145,55.931 h1.5
  text "CH1" at 27.595,54.595 h1.5
  text "CH2" at 32.479,54.57 h1.5
  text "AI3-" at 44.874,53.518 h1.5
  text "AI3-" at 17.145,53.442 h1.5
  text "2" at 53.829,51.532 h1.5 r90
  text "AI5+" at 44.938,50.902 h1.5
  text "AI5+" at 17.145,50.825 h1.5
  text "Выбор канала питания PXI-4110: CH1, CH2 / К PXI-2503" at 26.673,49.174 h1.5
  text "AI5-" at 44.874,48.362 h1.5
  text "AI5-" at 17.145,48.285 h1.5
  text "1" at 53.702,46.578 h1.5 r90
  text "AI6-" at 44.806,45.872 h1.5
  text "AI6-" at 17.145,45.796 h1.5
  text "AI7+" at 44.87,43.307 h1.5
  text "AI7+" at 17.145,43.231 h1.5
  text "Каналы от мат. платы" at 33.2,41.3 h1.5 r90
  text "Каналы к ПЛИС" at 30.3,41.134 h1.5 r90
  text "6" at 53.95,41.123 h1.5 r90
  text "1" at 10.922,40.894 h1.5 r90
  text "AI6-" at 44.806,40.843 h1.5
  text "AI6-" at 17.145,40.767 h1.5
  text "ENO" at 34.06,38.862 h1.5
  text "AI7-" at 44.806,38.252 h1.5
  text "AI7-" at 17.145,38.176 h1.5
  text "PRTI7" at 34.06,36.171 h1.5
  text "5" at 53.95,36.144 h1.5 r90
  text "AO0" at 44.981,35.738 h1.5
  text "DAC1" at 17.145,35.662 h1.5
  text "2" at 10.922,35.612 h1.5 r90
  text "PRTO7" at 34.06,33.554 h1.5
  text "DAC2" at 17.145,33.223 h1.5
  text "AO1" at 45.186,33.147 h1.5
  text "SDO" at 34.06,31.09 h1.5
  text "AO2" at 17.145,30.556 h1.5
  text "AO2" at 44.975,30.531 h1.5
  text "4" at 53.95,30.378 h1.5 r90
  text "3" at 10.922,30.099 h1.5 r90
  text "SS" at 34.06,28.551 h1.5
  text "AO3" at 45.049,28.067 h1.5
  text "AO3" at 17.145,27.991 h1.5
  text "SCK" at 34.06,26.138 h1.5
  text "AO5" at 17.145,25.502 h1.5
  text "AO5" at 45.049,25.425 h1.5
  text "3" at 53.95,25.375 h1.5 r90
  text "4" at 10.922,24.841 h1.5 r90
  text "SDI" at 34.06,23.572 h1.5
  text "AO7" at 17.145,23.012 h1.5
  text "AO7" at 44.98,22.911 h1.5
  text "nRST" at 34.06,21.065 h1.5
  text "AO4" at 44.981,20.447 h1.5
  text "AO4" at 17.145,20.371 h1.5
  text "5" at 10.922,19.583 h1.5 r90
  text "2" at 53.95,19.178 h1.5 r90
  text "LCLK0" at 34.06,18.373 h1.5
  text "AO6" at 44.981,17.805 h1.5
  text "AO6" at 17.145,17.729 h1.5
  text "LACK0" at 34.06,15.833 h1.5
  text "1" at 53.95,14.58 h1.5 r90
  text "6" at 10.922,14.249 h1.5 r90
  text "1" at 12.677,13.848 h1.5
  text "1" at 46.287,13.754 h1.5
  text "LINK07" at 34.06,13.462 h1.5
  text "Col. GND" at 52.984,13.081 h1.5 r110
  text "Col. GND" at 11.709,12.776 h1.5 r70
  text "2" at 46.128,11.176 h1.5
  text "2" at 12.678,11.13 h1.5
  text "OVR0" at 34.06,10.905 h1.5
  text "Измеряемые каналы. К PXI-2503" at 54.112,9.474 h1.5
  text "Каналы, ожидающие измерения. От PXI-2503" at 0.316,9.296 h1.5
  text "3" at 12.677,8.666 h1.5
  text "3" at 46.287,8.573 h1.5
  text "LINK13" at 34.06,8.433 h1.5
  text "4" at 46.152,6.121 h1.5
  text "4" at 12.677,6.101 h1.5
  text "nSTC" at 34.06,5.901 h1.5
  text "5" at 12.677,3.561 h1.5
  text "5" at 46.287,3.467 h1.5
  text "CLK60" at 34.06,3.234 h1.5
  text "Измеряемые каналы (1-6) / К PXI-2503" at 52.5,1.764 h1.5 r90
  text "К. ожид. изм. (1-6) / От PXI-2503" at 18.9,1.596 h1.5 r90
  text "6" at 12.677,0.919 h1.5
  text "6" at 46.177,0.889 h1.5
  text "STRB7" at 34.06,0.864 h1.5
Bottom Overlay:
  lines w0.254: 12.82,79.07 51.657,79.07 ; 14.541,77.197 12.655,79.083 14.541,80.969
  text "7841R" at 17.569,84.471 h5
  text "MB" at 51.15,84.455 h5
  text "IDC-50 от материнской платы" at 35.408,52.092 h1.5 r90
  text "IDC-50 к ПЛИС" at 29.159,48.056 h1.5 r90
Mechanical 1:
  circle w0.254: c59,5 r2.5
  circle w0.254: c59,83 r2.5
  circle w0.254: c5,83 r2.5
  circle w0.254: c5,5 r2.5
  lines w0.254: 0,0 0,88 64,88 64,0 0,0

## Text inside footprints (layer, text, board x,y; h text height)
X1: Bottom Overlay "Ухо" at 39.111,7.805 h2.52 r180; Bottom Overlay "Ухо" at 39.111,84.905 h2.52 r180
X2: Bottom Overlay "Ухо" at 21.535,7.805 h2.52 r180; Bottom Overlay "Ухо" at 21.535,84.905 h2.52 r180